# Altium PCB AirBnB-v1.1.PcbDoc (part 8 of 8)
Units mm, origin at the board's own origin, x right, y up, seen from the top; angles counter-clockwise.
Board outline 135.99 x 145 mm, 4 copper layers (Top Layer, Layer 2, Layer 3, Bottom Layer), stack 1.566 mm thick; 343 components, 205 nets, 1123 pads, 557 vias.
Unrouted connection lines stored in the file: 129.
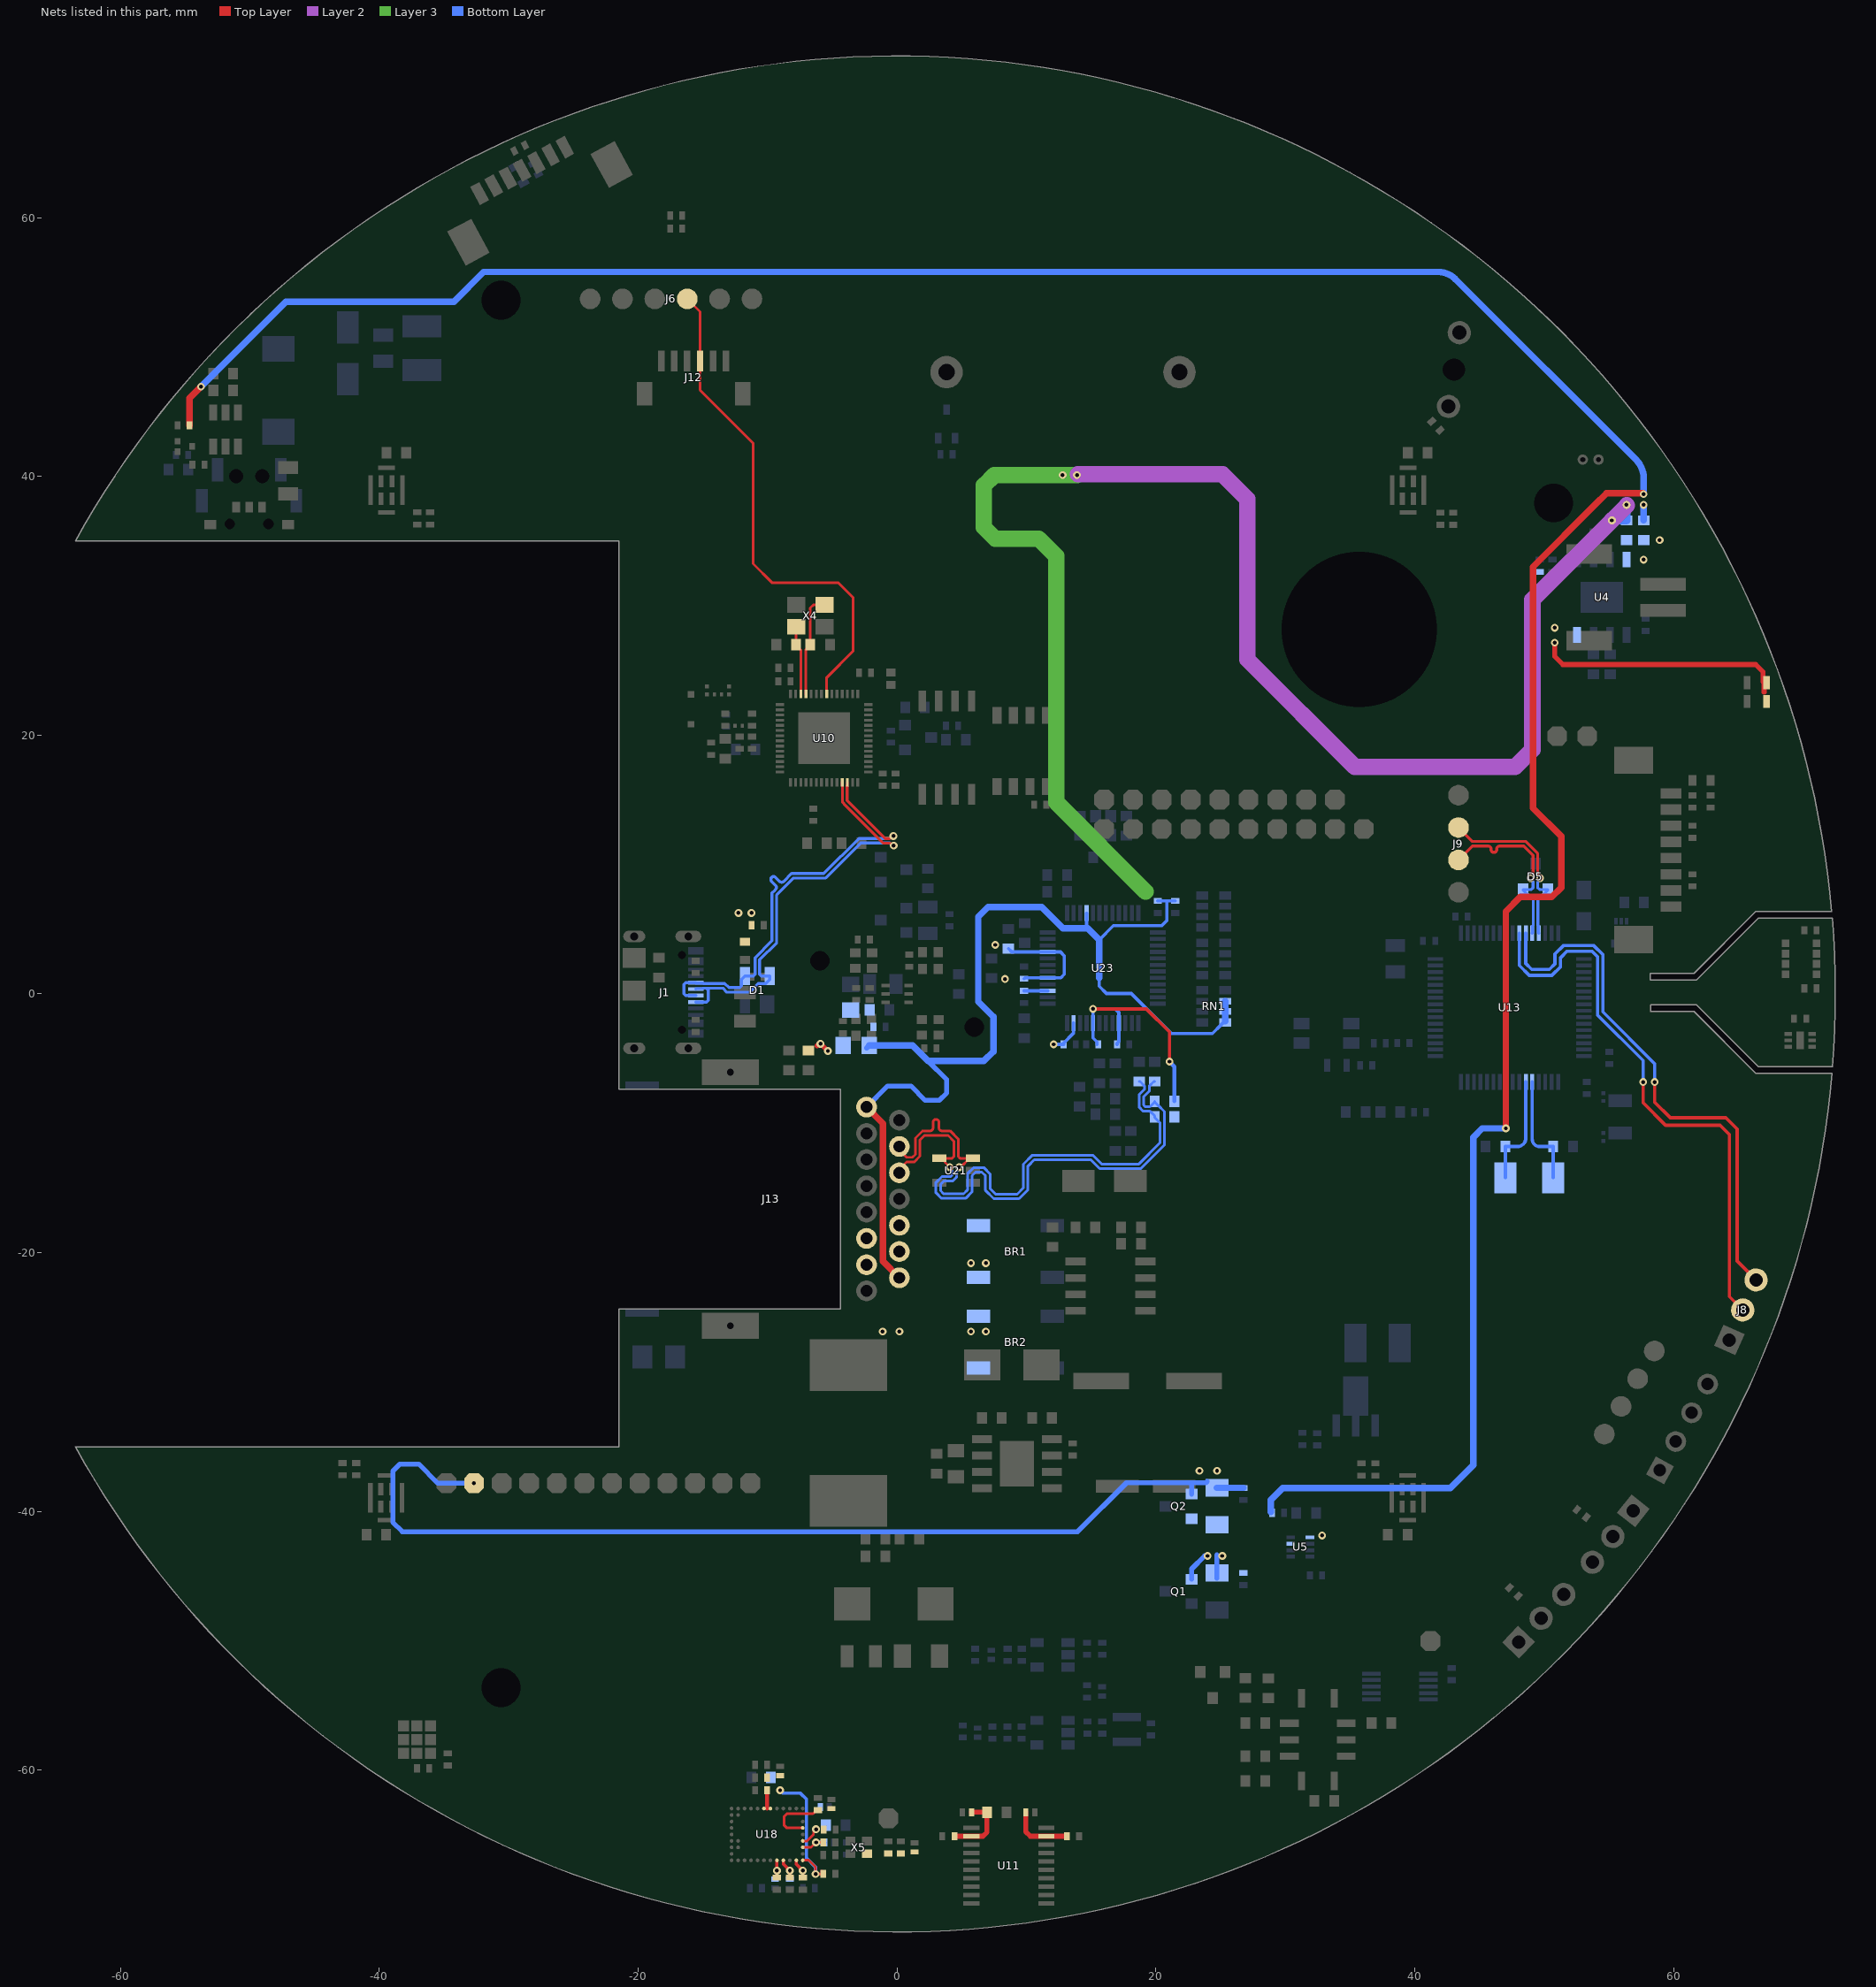
[diagram p6: the nets of this part, all layers, seen from the top]

## Via types
v1: diameter 0.6, hole 0.3, Top Layer to Bottom Layer, 557 vias

## Nets (pads, with @x,y where several pads share a name; then routed paths per layer and width w, separated by ;. In a path a pad name is that pad's centre, name@x,y a point inside that pad or via, vN(x,y) a via of type N, cw(c..) or ccw(c..) an arc to the next point about the centre after c; other vN are vias at no path point) (continued)
TD_N: J13.4 R59.1 R63.1 U21.4 | length 44
  Top Layer w0.203: J13.4@0.181,-13.82 0.181,-13.539 0.738,-12.982 1.335,-12.982 1.768,-12.549 1.768,-11.292 2.12,-10.94 3.95,-10.94 4.383,-11.373 4.383,-12.581 4.264,-12.7 U21.4@3.511,-12.7 ; U21.4@3.261,-12.7 U21.4@3.511,-12.7 ; v1(4.071,-13.39) 3.709,-13.028 3.709,-12.898 U21.4@3.511,-12.7
  Bottom Layer w0.203: v1(4.071,-13.39) 4.071,-13.497 4.257,-13.683 4.257,-13.994 4.138,-14.113 3.463,-14.113 3.005,-14.572 3.005,-15.362 3.44,-15.798 5.293,-15.798 5.795,-15.296 5.795,-14.046 6.071,-13.771 6.552,-13.771 6.83,-14.049 6.83,-15.186 7.474,-15.83 9.425,-15.83 10.114,-15.141 10.114,-13.304 10.603,-12.816 14.977,-12.816 15.555,-13.393 15.659,-13.497 18.838,-13.497 20.664,-11.671 20.664,-9.099 20.201,-8.635 20.182,-8.635 R59.1@19.902,-8.356 ; R59.1@19.902,-8.292 R59.1@19.902,-8.356 ; R63.1@19.902,-6.768 19.839,-6.768 19.483,-7.124 19.483,-7.514 19.054,-7.944 19.054,-8.592 19.173,-8.711 19.547,-8.711 R59.1@19.902,-8.356
TD_P: J13.2 R58.1 R64.1 U21.3 | length 44
  Top Layer w0.203: J13.2@0.181,-11.79 0.181,-12.07 0.738,-12.627 1.188,-12.627 1.413,-12.402 1.413,-11.145 1.959,-10.598 1.973,-10.585 2.551,-10.585 ccw(c2.551,-10.356) 2.78,-10.356 2.78,-9.922 cw(c3.008,-9.922) 3.237,-9.922 3.237,-10.356 ccw(c3.465,-10.356) 3.465,-10.585 4.024,-10.585 4.098,-10.585 4.739,-11.226 4.739,-12.581 4.858,-12.7 U21.3@5.488,-12.7 ; v1@4.997,-13.314 5.488,-12.823 U21.3@5.488,-12.7 ; U21.3@5.861,-12.7 U21.3@5.488,-12.7
  Bottom Layer w0.203: v1(4.798,-13.39) 4.798,-13.497 4.612,-13.683 4.612,-14.142 4.285,-14.469 3.61,-14.469 3.36,-14.719 3.36,-15.215 3.587,-15.442 5.146,-15.442 5.44,-15.149 5.44,-13.899 5.923,-13.416 6.7,-13.416 7.186,-13.902 7.186,-15.038 7.621,-15.474 9.278,-15.474 9.759,-14.993 9.759,-13.157 10.455,-12.46 15.125,-12.46 15.806,-13.142 18.691,-13.142 20.309,-11.524 20.309,-9.948 20.19,-9.829 20.182,-9.829 19.902,-9.55 R58.1@19.902,-9.486 19.902,-9.423 19.547,-9.067 19.025,-9.067 18.698,-8.74 18.698,-7.797 19.128,-7.367 19.128,-7.124 18.772,-6.768 R64.1@18.709,-6.768
TXD: J6.3 J12.3 U10.49 | length 39.7
  Top Layer w0.203: J6.3@-16.215,53.721 -15.223,52.729 J12.3@-15.223,48.913 -15.223,46.668 -11.125,42.57 -11.125,33.244 -9.675,31.795 -4.566,31.795 -3.383,30.612 -3.383,26.511 -5.439,24.455 U10.49@-5.439,23.186
USART1_RX: J8.3 U13.43 | length 42.5
  Top Layer w0.254: v1@58.547,-6.825 58.547,-8.366 59.754,-9.573 64.051,-9.573 64.921,-10.444 64.921,-20.648 J8.3@66.379,-22.105
  Bottom Layer w0.254: U13.43@48.584,4.698 48.584,2.355 49.047,1.893 50.409,1.893 50.836,2.32 50.836,3.088 51.48,3.733 53.85,3.733 54.538,3.045 54.538,-1.39 58.547,-5.399 v1(58.547,-6.806)
USART1_TX: J8.2 U13.42 | length 44.6
  Top Layer w0.254: v1(57.647,-6.806) 57.647,-8.406 59.387,-10.146 63.595,-10.146 64.312,-10.864 64.312,-23.392 J8.2@65.346,-24.426
  Bottom Layer w0.254: U13.42@48.084,4.698 48.084,2.205 48.86,1.43 50.601,1.43 51.27,2.099 51.27,2.801 51.761,3.292 53.713,3.292 54.136,2.868 54.136,-1.634 57.647,-5.145 v1(57.647,-6.806)
USB_D_N: D5.2 J9.3 U13.44 | length 14.4
  Top Layer w0.229: J9.3@43.383,10.358 44.455,11.43 45.127,11.43 45.674,11.43 cw(c45.674,11.201) 45.902,11.201 45.902,11.158 ccw(c46.118,11.158) 46.334,11.158 46.334,11.201 cw(c46.563,11.201) 46.563,11.43 47.667,11.43 48.438,11.43 49.144,10.724 49.144,9.095 v1@48.958,8.91
  Bottom Layer w0.229: v1(48.958,8.96) 48.958,8.859 49.144,8.674 49.144,8.202 49.01,8.068 D5.2@48.378,8.068 48.378,8.018 48.674,7.722 48.724,7.722 49.156,7.29 49.156,5.292 49.12,5.256 49.12,4.734 U13.44@49.084,4.698
USB_D_P: D5.1 J9.2 U13.45 | length 14.4
  Top Layer w0.229: J9.2@43.383,12.858 44.455,11.786 48.585,11.786 49.499,10.871 49.499,9.095 v1@49.685,8.91
  Bottom Layer w0.229: U13.45@49.584,4.698 49.549,4.734 49.549,5.256 49.512,5.292 49.512,7.301 49.933,7.722 49.983,7.722 50.278,8.018 D5.1@50.278,8.068 49.64,8.068 49.499,8.208 49.499,8.674 49.685,8.859 v1(49.685,8.96)
USB_N: D1.4 J1.A7 J1.B7 U10.25 | length 33.8
  Top Layer w0.229: U10.25@-4.239,16.336 -4.239,16.13 -4.217,16.108 -4.217,14.798 -4.008,14.59 -1.283,11.865 -1.075,11.657 -0.557,11.657 -0.361,11.461 v1(-0.261,11.461)
  Bottom Layer w0.229: J1.B7@-15.556,-0.623 -14.733,-0.623 -14.599,-0.489 -14.599,0.291 -14.756,0.449 ; J1.A7@-15.556,0.377 -15.521,0.412 -14.999,0.412 -14.963,0.449 -14.756,0.449 ; v1(-0.261,11.461) -0.36,11.461 -0.566,11.666 -2.803,11.666 -5.512,8.958 -8.004,8.958 -9.306,7.656 -9.306,3.956 -10.62,2.642 -10.62,1.528 -10.486,1.394 D1.4@-9.848,1.394 -9.848,1.094 -10.133,0.809 -10.74,0.809 -11.413,0.136 -13.146,0.136 -13.459,0.449 -14.756,0.449
USB_P: D1.3 J1.A6 J1.B6 U10.26 | length 33.8
  Top Layer w0.229: U10.26@-3.839,16.336 -3.839,16.13 -3.861,16.108 -3.861,14.945 -0.928,12.012 -0.575,12.012 -0.38,12.208 v1(-0.279,12.208)
  Bottom Layer w0.229: J1.A6@-15.556,-0.123 -15.565,-0.115 -16.325,-0.115 -16.459,0.019 -16.459,0.734 -16.325,0.868 -15.565,0.868 J1.B6@-15.556,0.877 ; J1.B6@-15.556,0.841 -14.999,0.841 -14.963,0.805 -13.312,0.805 -12.998,0.491 -12.167,0.491 -12.033,0.625 -12.033,1.109 D1.3@-11.748,1.394 -11.109,1.394 -10.975,1.528 -10.975,2.789 -9.661,4.104 -9.661,7.803 -9.468,7.996 -9.388,8.077 ccw(c-9.549,8.238) -9.388,8.4 -9.695,8.707 cw(c-9.542,8.86) -9.695,9.013 cw(c-9.542,8.86) -9.39,9.013 -9.082,8.705 ccw(c-8.921,8.867) -8.759,8.705 -8.151,9.313 -7.952,9.313 -5.659,9.313 -2.951,12.022 -0.566,12.022 -0.38,12.208 v1(-0.279,12.208)
VAREF: C101.1 U18.L1 | length 1.5
  Top Layer w0.254: U18.L1@-7.785,-66.961 -7.785,-67.262 v1(-7.285,-67.762) C101.1@-7.285,-68.292
VBUS: C11.2 D2.2 D3.2 FB2.2 P1.1 Q1.1 Q2.1 R4.1 R8.1 SB4.1 U5.5 | length 205.5
  Layer 2 w1.27: v1@13.965,40.174 25.143,40.174 27.055,38.262 27.055,25.865 35.378,17.543 47.757,17.543 49.094,18.88 49.094,30.458 v1(55.237,36.601) v1@56.399,37.763
  Layer 3 w1.27: v1(13.897,40.107) v1(12.795,40.107) 7.515,40.107 6.713,39.305 6.713,36.059 7.577,35.195 10.941,35.195 12.298,33.839 12.298,14.806 19.203,7.901
  Bottom Layer w0.381: v1(-32.69,-37.821) -35.479,-37.821 -36.966,-36.334 -38.408,-36.334 -38.964,-36.891 -38.964,-40.836 -38.231,-41.569 13.944,-41.569 17.735,-37.778 22.761,-37.778 23.859,-37.778 D3.2@23.962,-37.674 ; Q1.1@22.761,-45.231 22.761,-44.443 23.77,-43.434 v1(23.996,-43.434) ; Q2.1@22.761,-38.653 22.761,-37.963 ; D2.2@24.723,-45.161 D2.2@24.723,-44.751 24.723,-43.364
  Bottom Layer w0.508: D3.2@24.723,-38.173 R8.1@26.757,-38.173
  Bottom Layer w0.635: v1(55.237,36.601) SB4.1@56.363,36.601 v1(56.363,37.8)
  other v1: 25.13,-43.434 32.842,-41.854 23.368,-36.855 24.723,-36.855 -12.258,6.261 -11.254,6.261
VC1+: BR2.2 J13.9
  other v1: 5.715,-26.099 6.858,-26.099
VC1-: BR1.4 J13.8
VC2+: BR2.4 J13.10
VC2-: BR1.2 J13.11
  other v1: -1.118,-26.099 0.181,-26.099 5.715,-20.803 6.858,-20.803
VCCA: C34.2 FB7.2 R26.2 U11.2 | length 5.4
  Top Layer w0.381: C34.2@4.436,-65.099 6.63,-65.099 6.947,-64.781 R26.2@6.947,-63.246 FB7.2@5.75,-63.246
VCCB: C35.2 FB8.2 U11.19 | length 4.8
  Top Layer w0.381: FB8.2@9.945,-63.246 9.945,-64.749 10.295,-65.099 U11.19@11.534,-65.099 C35.2@13.13,-65.099
VCHRG: LED1.1 LED2.1 R74.2 SB3.2 SB4.2 U4.4 U4.8 | length 19.3
  Top Layer w0.381: v1(50.825,27.158) 50.825,26.079 51.443,25.461 66.352,25.461 66.911,24.902 66.911,24.144 67.001,24.054 67.001,23.33
  other v1: 50.825,28.304 57.694,33.566 58.928,35.077
VDD: C72.2 C73.2 FB9.2 FB10.1 J13.12 J13.14 R68.1 R69.1 RN1.6 RN1.7 RN1.8 U23.28 | length 85.1
  Top Layer w0.508: J13.12@-2.359,-8.745 -1.089,-10.015 -1.089,-20.67 J13.14@0.181,-21.94
  Bottom Layer w0.254: U23.28@14.639,6.245 14.639,5.164 14.74,5.064 ; 14.649,5.286 U23.28@14.649,6.235 ; 15.614,4.175 16.716,5.277 20.45,5.277 20.844,5.671 20.844,7.188 ; 15.621,1.248 15.621,0.6 16.181,0.04 18.101,0.04 21.206,-3.064 24.362,-3.064 25.032,-2.394 25.23,-2.196 RN1.8@25.355,-2.196 ; R68.1@20.142,7.188 20.844,7.188 ; R69.1@21.5,7.188 20.844,7.188
  Bottom Layer w0.381: J13.12@-2.359,-8.415 J13.12@-2.359,-8.745 -0.732,-7.118 1.073,-7.118 2.184,-8.23 3.249,-8.23 3.834,-7.645 3.834,-6.622 2.393,-5.182 ; FB10.1@-2.358,-4.187 FB10.1@-2.159,-3.988
  Bottom Layer w0.508: FB10.1@-2.159,-3.988 1.2,-3.988 2.393,-5.182 6.702,-5.182 7.437,-4.446 7.437,-1.765 6.274,-0.602 6.274,5.959 7.026,6.711 11.182,6.711 12.83,5.064 14.74,5.064 15.621,4.182 15.621,1.248 ; RN1.8@25.355,-2.12 RN1.7@25.355,-1.356 RN1.6@25.355,-0.556
VDD_A: C106.2 FB15.1 U18.J1 | length 1.5
  Top Layer w0.254: U18.J1@-8.785,-66.961 -8.785,-67.262 v1(-8.285,-67.762) C106.2@-8.285,-68.292
VDD_D: C107.2 FB16.1 U18.H1 | length 1.3
  Top Layer w0.254: C107.2@-9.285,-68.292 v1(-9.285,-67.762) U18.H1@-9.285,-66.961
VDD_LF: C104.2 FB14.1 U18.M3 | length 2.4
  Top Layer w0.203: U18.M3@-7.285,-65.961 -6.64,-65.961 v1(-6.26,-65.582) C104.2@-5.711,-65.582
  Bottom Layer w0.305: v1(-6.26,-65.582) FB14.1@-5.591,-65.582
VDD_OSC: C99.1 C100.1 FB11.1 X5.4
VDD_PLL: C103.2 C108.2 FB13.1 U18.M4 | length 1.5
  Top Layer w0.203: U18.M4@-7.285,-65.461 -6.949,-65.461 -6.456,-64.969 -6.456,-64.758 v1(-6.26,-64.562)
VDD_RF: C105.2 C109.2 C110.2 C111.2 FB17.1 U18.F9 U18.G9 U18.M1 | length 12.4
  Top Layer w0.203: U18.M1@-7.285,-66.961 -6.822,-66.961 -6.299,-67.484 v1(-6.299,-68.021) ; v1@-6.289,-68.011 v1@-6.28,-68.021 ; C105.2@-5.838,-67.796 -5.754,-67.88 C105.2@-5.754,-68.011 ; C105.2@-5.72,-68.021 C105.2@-5.711,-68.011
  Top Layer w0.254: v1@-6.28,-68.021 C105.2@-5.72,-68.021
  Top Layer w0.305: -10.035,-62.961 C109.2@-10.035,-61.549
  Bottom Layer w0.254: v1(-9.037,-61.549) -8.809,-61.778 -7.458,-61.778 -6.995,-62.241 -6.995,-66.788 -6.299,-67.484 v1(-6.299,-68.021)
VDD_VCO: C102.2 FB12.1 U18.M6 | length 5
  Top Layer w0.203: U18.M6@-7.285,-64.461 -8.508,-64.461 -8.74,-64.229 -8.74,-63.598 -8.506,-63.364 -6.494,-63.364 C102.2@-6.17,-63.039 ; C102.2@-6.17,-63.037 C102.2@-6.124,-63.083
VDDA: C77.2 C79.2 C81.2 C82.2 C83.2 C84.2 FB10.2 R50.2 R58.2 R59.2 U23.4 U23.8 U23.11 U23.15 U23.17 U23.21 | length 34.6
  Top Layer w0.254: v1(15.139,-1.157) 19.267,-1.157 21.045,-2.935 v1(21.045,-5.231)
  Top Layer w0.381: R50.2@-6.845,-4.369 R50.2@-6.834,-4.38 ; -6.19,-4.013 -6.033,-3.857 -5.903,-3.857 v1(-5.35,-4.41)
  Bottom Layer w0.254: C84.2@8.612,3.498 8.865,3.245 U23.21@11.639,3.245 12.629,3.245 12.927,2.947 12.927,1.518 12.654,1.245 U23.17@11.639,1.245 9.881,1.245 C83.2@9.819,1.182 ; C82.2@9.819,0.242 9.82,0.243 11.638,0.243 U23.15@11.639,0.245 ; v1(12.098,-3.898) C81.2@12.867,-3.898 12.867,-3.809 13.629,-3.046 13.629,-2.265 U23.11@13.639,-2.255 ; C77.2@15.445,-3.898 15.445,-3.708 15.139,-3.402 U23.8@15.139,-2.255 v1(15.139,-1.157) 16.858,-1.157 17.139,-1.438 U23.4@17.139,-2.255 17.139,-3.679 17.009,-3.809 C79.2@17.009,-3.898
  Bottom Layer w0.305: v1(21.045,-5.231) 21.426,-5.612 R59.2@21.426,-8.292
  other v1: -5.919,-3.857 8.34,1.156 7.591,3.792
VIN1: D3.1 Q2.2 R9.2 R11.2 SB3.1 U5.3 | length 232.1
  Top Layer w0.508: R11.2@-54.667,43.942 -54.667,46.05 v1(-53.782,46.936) ; v1(47.041,-10.389) 47.041,6.378 48.155,7.491 50.595,7.491 51.327,8.223 51.327,12.182 49.13,14.379 49.13,32.99 53.94,37.8 54.831,38.691 57.641,38.691 v1(57.694,38.638)
  Bottom Layer w0.508: v1(-53.782,46.936) -47.225,53.492 -34.251,53.492 -31.939,55.804 41.811,55.804 cw(c41.811,53.92) 43.143,55.253 ; R9.2@28.891,-40.027 28.891,-39.103 29.804,-38.189 42.74,-38.189 44.526,-36.403 44.526,-11.076 45.213,-10.389 v1(47.041,-10.389) ; 43.144,55.252 57.095,41.3 cw(c55.651,39.856) 57.694,39.856 v1(57.694,38.638) ; SB3.1@57.694,36.601 v1(57.694,37.8)
XTAL_IN: C41.2 U13.5 X2.1 | length 8.8
  Bottom Layer w0.254: U13.5@49.084,-6.802 49.084,-11.222 ccw(c49.658,-11.222) 49.658,-11.796 C41.2@50.703,-11.796 X2.1@50.703,-14.209
XTAL_N: C55.2 U10.53 X4.3 | length 8
  Top Layer w0.203: U10.53@-7.039,23.186 -7.039,26.604 -6.706,26.937 -6.706,29.827 -6.461,30.072 X4.3@-5.606,30.072
XTAL_OUT: C44.2 U13.6 X2.2 | length 8.7
  Bottom Layer w0.254: X2.2@47.003,-14.209 C44.2@47.003,-11.796 47.934,-11.796 ccw(c47.934,-11.146) 48.584,-11.146 U13.6@48.584,-6.802
XTAL_P: C53.2 U10.54 X4.1 | length 5.3
  Top Layer w0.203: X4.1@-7.806,28.372 -7.806,26.937 -7.439,26.57 U10.54@-7.439,23.186
pads on no net: J1.A8 J1.B8 J1.MH J2.MP1 J2.MP2 J3.1 J3.6 J3.7 J3.8 J3.9 J5.7 J5.8 J5.S1 J5.S2 J9.4 J12.MP1 J12.MP2 LED8.2 RN1.4 RN1.5 RN2.1 RN2.2 RN2.7 RN2.8 SW2.MH SW2.MP SW3.2 SW3.4 SW3.5 SW3.MH SW4.MH U1.4 U2.4 U6.6 U7.2 U7.5 U10.8 U10.28 U10.38 U10.39 U10.40 U10.41 U10.42 U10.52 U12.5 U13.2 U13.8 U13.9 U13.11 U13.14 U13.15 U13.21 U13.22 U13.24 U13.25 U13.26 U13.27 U13.29 U13.33 U13.35 U13.37 U13.38 U13.39 U13.40 U13.41 U13.50 U13.51 U13.52 U13.53 U13.54 U13.55 U13.56 U13.57 U13.58 U13.59 U13.62 U15.2 U19.7 U20.7 U23.7 U23.12 U23.13 U23.18 U23.24 U23.26 U23.46 U23.47 U26.6 U26.9 U27.3 U27.5 X5.1

## Polygon pours and split planes (outlines as drawn)
3V3 on Layer 3 "3V3_L03_P036" (solid, remove dead copper, pour order 36): -31.082,35.712 -31.082,46.533 -14.91,46.533 -14.91,10.287 -20.726,10.287 -20.726,-6.629 -3.356,-6.629 -3.356,-25.121 -20.726,-25.121 -20.726,-35.738 -62.338,-35.738 ccw(c0.213,-0.162) 71.882,-6.629 66.269,-6.629 61.392,-1.753 57.785,-1.753 57.785,2.007 61.239,2.007 66.065,6.833 71.795,6.833 ccw(c0.179,0.171) -62.352,35.712
5V_BOOST on Layer 3 "5V_BOOST_L03_P031" (solid, pour order 31): 15.808,20.543 15.808,18.678 29.032,5.453 29.032,-36.961 30.069,-37.998 34.595,-37.998 36.246,-39.649 36.246,-43.921 35.39,-44.776 31.674,-44.776 31.674,-42.683 33.92,-42.683 33.92,-40.132 26.264,-40.132 26.264,2.184 13.259,15.189 13.259,34.442 11.454,36.247 7.95,36.247 7.95,39.112 15.808,39.112
5V on Layer 3 "5V_L03_P028" (solid, pour order 28): 20.295,52 cw(c7.832,-0.716) 44.644,39.024 55.27,28.397 55.27,16.579 64.389,16.579 64.389,14.644 55.27,14.644 55.27,4.098 45.771,4.098 45.771,-43.663 37.77,-51.664 22.632,-51.664 21.469,-52.827 21.469,-58.998 20.93,-59.538 17.907,-59.538 17.4,-59.031 17.4,-52.859 13.421,-48.879 -26.94,-48.879 -29.235,-46.584 -29.235,-37.44 -27.635,-37.44 -27.635,-43.332 -25.857,-45.11 15.743,-45.11 15.743,-46.975 17.488,-46.975 17.488,-45.11 25.287,-45.11 26.467,-43.93 26.467,-41.848 27.885,-41.848 27.885,-42.672 29.54,-42.672 29.54,-45.11 35.585,-45.11 36.652,-44.044 36.652,-39.472 34.871,-37.69 30.299,-37.69 29.464,-36.855 29.464,-30.05 37.135,-30.05 37.135,13.03 24.714,25.451 24.714,46.736 20.295,46.736
VDDA on Layer 3 "VDDA_L03_P027" (solid, pour order 27): 15.646,-12.871 4.383,-12.871 4.383,-6.426 -6.375,-6.426 -6.375,-2.857 3.237,-2.857 6.385,0.29 6.385,4.089 12.522,4.089 15.646,0.965
POE_PWR_P on Layer 3 "POE_PWR_P_L03_P034" (solid, pour order 34): 17.018,-27.655 21.133,-27.655 21.133,-44.632 17.018,-44.632
POE_PWR_P on Layer 3 "POE_PWR_P_L03_P033" (solid, pour order 33): 16.967,0.914 16.967,-27.076 21.133,-27.076 21.133,-3.251
5V on Layer 3 "5V_L03_P029" (solid, pour order 29): -14.903,19.961 -14.917,10.287 -21.107,10.287 -21.107,-6.426 -6.629,-6.426 -6.629,-2.601 2.936,-2.601 7.003,1.466 14.839,1.466 14.839,1.747 12.548,4.039 -5.512,4.039 -7.366,2.184 -8.534,2.184 -8.534,5.029 -13.157,5.029 -13.157,8.052 -7.849,8.052 -7.849,15.75 6.688,15.75 6.688,29.412 2.54,29.412 2.54,19.961
1V8_SENSOR on Layer 3 "1V8_SENSOR_L03_P025" (solid, pour order 25): 7.747,-52.045 5.512,-52.045 5.512,-60.339 4.56,-61.29 -5.037,-61.29 -5.037,-68.402 -1.778,-68.402 -1.778,-63.652 5.816,-63.652 7.747,-61.722
5V_BOOST on Layer 3 "5V_BOOST_L03_P024" (solid, pour order 24): -36.162,53.061 -36.162,48.438 -31.211,48.438 -31.211,53.061
VBUS on Layer 3 "VBUS_L03_P022" (solid, pour order 22): 33.553,-41.519 33.553,-40.381 32.842,-40.381 32.842,-41.519 30.757,-41.519 30.757,-40.386 25.959,-40.386 25.959,2.031 18.769,9.22 -4.693,9.22 -6.16,7.773 -12.903,7.773 -12.903,5.309 -3.632,5.309 -3.632,6.096 -2.464,6.096 -2.464,5.309 13.365,5.309 21.488,-2.815 21.488,-44.704 25.171,-44.704 26.213,-43.663 26.213,-41.58 28.147,-41.58 28.147,-42.418 33.553,-42.418
VC1+ on Layer 3 "VC1+_L03_P020" (solid, pour order 20): -4.064,-19.91 -4.064,-6.655 3.697,-6.655 3.697,-13.224 10.566,-13.224 10.566,-27.076 3.658,-27.076 7.798,-22.936 7.798,-19.05 2.51,-19.05 1.65,-19.91
VC2- on Layer 3 "VC2-_L03_P019" (solid, pour order 19): 5.613,-19.279 2.73,-19.279 1.27,-20.739 1.27,-23.622 -0.787,-23.622 -0.787,-20.125 -4.064,-20.125 -4.064,-27.076 3.215,-27.076 7.569,-22.722 7.569,-19.279
GND on Bottom Layer "GND_L04_P038" (solid, remove dead copper, pour order 38): -31.082,35.727 -31.082,46.533 -15.367,46.533 -15.367,10.287 -21.107,10.287 -21.107,-6.706 -3.717,-6.706 -3.717,-24.917 -20.879,-24.917 -20.879,-35.738 -62.206,-35.738 ccw(c0.276,-0.18) 71.877,-6.629 66.269,-6.629 61.392,-1.753 57.785,-1.753 57.785,2.007 61.239,2.007 66.065,6.833 71.787,6.833 ccw(c0.243,0.194) -62.206,35.727
VC2- on Bottom Layer "VC2-_L04_P018" (solid, pour order 18): -4.064,-19.91 -4.064,-27.076 0.981,-27.076 0.981,-23.292 -0.838,-23.292 -0.838,-19.91
#VBUS on Bottom Layer "#VBUS_L04_P015" (solid, pour order 15): -14.598,2.227 -13.598,1.227 -12.497,1.227 -12.497,4.002 -13.424,4.002 -14.599,2.827 -16.176,2.827 -16.676,3.327 -19.316,3.327 -19.316,-2.773 -16.356,-2.773 -16.156,-2.573 -11.348,-2.573 -11.348,-0.106 -14.097,-0.106 -14.097,-1.523 -14.547,-1.973 -16.162,-1.973 -16.459,-1.676 -17.424,-1.676 -17.755,-1.346 -17.755,1.651 -17.357,2.049 -16.744,2.049 -16.566,2.227
5V on Bottom Layer "5V_L04_P014" (solid, pour order 14): 29.557,-47.699 28.975,-48.281 22.301,-48.281 22.301,-46.721 27.555,-46.721 28.147,-46.129 28.147,-44.606 27.622,-44.081 26.447,-44.081 26.447,-41.848 28.147,-41.848 28.147,-42.848 30.757,-42.848 30.922,-42.683 30.922,-40.72 31.896,-40.72 31.896,-41.33 31.419,-41.33 31.419,-42.7 31.567,-42.848 32.237,-42.848 32.237,-43.148 31.567,-43.148 31.464,-43.252 31.464,-43.648 30.862,-43.648 30.862,-43.253 30.757,-43.148 29.673,-43.148 29.557,-43.264
GND on Layer 2 "GND_L02_P039" (solid, pour order 39): -31.082,35.727 -31.082,46.533 -15.621,46.533 -15.621,10.287 -21.107,10.287 -21.107,-6.706 -3.717,-6.706 -3.717,-24.917 -20.879,-24.917 -20.879,-35.738 -62.206,-35.738 ccw(c0.276,-0.18) 71.877,-6.629 66.269,-6.629 61.392,-1.753 57.785,-1.753 57.785,2.007 61.239,2.007 66.065,6.833 71.787,6.833 ccw(c0.243,0.194) -62.206,35.727
VC1+ on Layer 2 "VC1+_L02_P017" (solid, pour order 17): -4.064,-17.314 -0.384,-17.314 -0.384,-23.693 7.498,-23.693 7.498,-27.076 -4.064,-27.076
GND on Top Layer "GND_L01_P037" (solid, remove dead copper, pour order 37): -31.082,35.727 -31.082,46.533 -15.621,46.533 -15.621,10.287 -21.107,10.287 -21.107,-6.706 -3.717,-6.706 -3.717,-24.917 -20.879,-24.917 -20.879,-35.738 -62.206,-35.738 ccw(c0.276,-0.18) 71.877,-6.629 66.269,-6.629 61.392,-1.753 57.785,-1.753 57.785,2.007 61.239,2.007 66.065,6.833 71.787,6.833 ccw(c0.243,0.194) -62.206,35.727
NetR54_1 on Top Layer "NETR54_1_L01_P035" (solid, pour order 35): 3.911,-34.786 3.911,-36.152 10.574,-36.152 10.574,-35.091 5.486,-35.091 5.181,-34.786
POE_PWR_P on Top Layer "POE_PWR_P_L01_P021" (solid, pour order 21): 15.619,-37.163 13.284,-39.497 5.181,-39.497 5.181,-36.645 2.286,-36.645 2.286,-41.3 19.406,-41.3 19.406,-31.318 20.226,-31.318 20.226,-28.854 23.8,-28.854 23.8,-26.455 16.675,-26.455 16.675,-28.194 13.618,-28.194 13.618,-32.995 15.619,-32.995

## Other copper
Top Layer:
  rectangle net OS_OT: -4.999,-66.786 -3.213,-66.245
  region net GND: -27.842,63.362 -27.139,63.744 -28.477,66.208 -29.18,65.826
  region net CH2O_5V: -30.189,64.264 -29.141,64.833 -29.561,65.608 -30.609,65.039
  region net CH2O_5V: -28.94,62.765 -28.228,63.152 -29.524,65.539 -30.236,65.152
  rectangle net VBUS: 55.96,36.175 56.745,38.147
  rectangle net VBUS: 54.937,36.175 56.745,37.078
  rectangle net VIN1: 57.235,37.49 58.047,38.977
  rectangle net BATT: 55.704,25.853 57.437,30.158
  rectangle net SPIHD: 2.93,21.247 3.51,23.443
  rectangle net GND: -16.639,20.545 -14.808,21.175
  rectangle net 5V: 53.77,4.329 55.103,6.044
  rectangle net 5V: 26.447,-42.084 31.946,-40.966
  region net BATT: -49.768,35.829 -49.768,39.16 -50.368,39.16 -50.368,35.829
  rectangle net NetC74_1: 11.663,-38.515 12.31,-37.635
  rectangle net NetC74_2: -8.839,-52.033 -3.369,-37.178
  rectangle net NetR54_1: 7.961,-38.061 10.574,-33.627
  rectangle net NetC71_1: -8.839,-34.105 7.33,-31.674
  rectangle net NetC71_1: -8.839,-31.928 7.965,-30.336
  rectangle net POE_PWR_P: 2.286,-37.427 7.343,-36.645
  rectangle net POE_PWR_P: 21.311,-28.854 23.8,-18.745
  rectangle net POE_PWR_P: 15.619,-38.563 19.304,-28.678
  rectangle net POE_PWR_P: 15.215,-38.563 19.304,-37.563
  rectangle net POE_PWR_P: 13.618,-30.551 19.304,-29.291
  rectangle net POE_PWR_P: 18.417,-20.98 23.8,-18.745
  rectangle net NetR46_1: 16.865,-21.475 17.705,-18.796
  region net NetR46_1: 15.418,-23.763 17.705,-21.475 17.11,-20.88 14.822,-23.167
  rectangle net NetR46_1: 12.444,-23.763 15.418,-22.784
  rectangle net NetR45_2: 13.017,-20.98 14.567,-19.177
  rectangle net NetR45_2: 13.017,-20.98 14.402,-17.59
  rectangle net NetR47_2: 10.566,-22.479 12.444,-19.177
  rectangle net NetR47_2: 10.566,-22.479 14.567,-21.387
  rectangle net NetAnt1_ANT#: -16.176,22.983 -13.98,23.339
  rectangle net 5V_BOOST: 11.963,53.949 15.088,56.295
  region net BATT: 46.625,49.901 47.663,50.94 41.072,57.531 40.034,56.493
  rectangle net BATT: 37.871,56.109 41.072,57.531
  rectangle net BATT: 46.146,32.461 47.663,50.94
  rectangle net GND: 57.364,31.158 60.937,32.726
  region net BATT: -43.837,45.576 -33.988,55.425 -34.901,56.338 -44.75,46.489
  rectangle net BATT: -44.75,37.025 -43.409,46.489
  rectangle net 3V3_AUD: 50.978,3.831 53.016,6.366
  rectangle net 3V3: -14.681,20.579 -12.393,21.031
  rectangle net 3V3: -14.681,19.191 -12.833,21.031
  rectangle net 3V3: 30.683,-29.261 34.223,-23.811
  rectangle net 5V: 30.686,-34.215 34.223,-29.57
  rectangle net 5V: 29.464,-42.084 31.946,-40.605
  rectangle net 3V3: -1.431,16.811 0.195,17.268
  rectangle net 3V3: -2.539,17.051 0.195,17.271
  rectangle net VDDA: -7.294,-4.75 -3.861,-3.483
  rectangle net POE_PWR_N: 10.516,-27.184 15.72,-24.19
  rectangle net VDD_OSC: -2.713,-66.75 1.643,-66.111
  rectangle net VDD_PLL: -6.558,-64.902 -5.452,-64.205
  rectangle net VDD_VCO: -6.442,-63.311 -4.779,-62.763
  rectangle net VDD_RF: -10.427,-63.124 -9.642,-62.739
  rectangle net VDD_RF: -10.264,-61.867 -8.737,-60.211
  rectangle net 5V_PoE: 7.747,-52.083 9.95,-41.859
  rectangle net 5V_PoE: 2.608,-52.083 9.95,-50.283
  rectangle net NetC64_1: -8.801,-6.274 -6.394,-5.512
  rectangle net POE_PWR_N: 10.566,-18.415 12.444,-13.197
  rectangle net POE_PWR_P: 18.417,-20.98 21.285,-13.197
  rectangle net POE_PWR_N: 14.935,-18.479 17.704,-15.827
  rectangle net POE_PWR_N: 16.942,-18.479 17.704,-15.827
  rectangle net POE_PWR_N: 13.411,-17.15 17.704,-15.827
  rectangle net POE_PWR_N: 10.566,-17.15 15.277,-13.197
  rectangle net POE_PWR_P: 16.777,-15.476 21.285,-13.197
  rectangle net POE_PWR_N: 10.566,-15.476 15.277,-13.197
  rectangle net 3V3: -8.467,22.861 -8.01,24.634
  rectangle net 3V3: -8.349,22.861 -7.729,23.511
  rectangle net GND: 10.292,13.274 10.889,14.948
  rectangle net 3V3: 11.185,13.274 11.885,16.683
  rectangle net NetC33_2: -9.389,21.451 -8.739,22.071
  rectangle net VCHRG: 66.564,22.106 67.437,24.554
  rectangle net VCHRG: 55.804,32.966 59.433,35.584
  rectangle net VCHRG: 55.804,31.572 56.972,35.56
  rectangle net VCHRG: 50.038,31.572 56.972,32.908
  rectangle net VCHRG: 50.038,26.558 51.384,32.908
  rectangle net GND: 59.665,31.158 60.937,35.56
  rectangle net BATT: 61.224,27.149 63.271,30.158
  rectangle net BATT: 55.704,28.6 63.271,30.158
  rectangle net NetL2_1: -53.746,37.059 -50.768,37.88
  rectangle net 5V_BOOST: -34.9,50.196 -32.537,52.609
  rectangle net GND: -34.9,47.219 -32.537,49.632
  rectangle net NetL2_1: -50.3,41.677 -45.263,44.136
  rectangle net SW_5V: -49.164,44.326 -45.263,50.86
  rectangle net SW_5V: -51.252,44.326 -49.086,45.546
  rectangle net NetL2_1: -52.202,43.073 -45.263,44.136
  rectangle net NetL2_1: -53.746,37.059 -52.53,41.402
  rectangle net NetL2_1: -52.258,40.585 -51.529,44.136
  rectangle net NetL2_1: -53.746,40.585 -51.529,41.402
  rectangle net NetQ3_3: -54.682,41.706 -52.532,42.951
  rectangle net NetQ3_3: -54.682,40.587 -54.163,42.951
  rectangle net NetQ3_3: -53.152,41.706 -52.532,42.926
  region net BATT: -43.534,37.025 -43.534,39.16 -48.311,39.16 -48.311,37.025
  region net BATT: -46.299,38.144 -46.299,39.16 -51.368,39.16 -51.368,38.144
  rectangle net #VBUS: -19.016,-0.686 -12.889,0.127
  rectangle net #VBUS: -19.016,-1.672 -17.836,0.127
  rectangle net VBUS: -13.868,4.027 -10.795,6.706
  region net VBUS: -10.795,6.706 -12.59,6.706 -12.59,3.727 -10.795,3.727
  rectangle net NetC8_2: -12.605,-0.396 -10.795,2.927
  rectangle net #VBUS: -13.894,-2.692 -10.795,-1.402
  rectangle net #VBUS: -14.249,-2.692 -12.889,3.691
  rectangle net 5V: 26.447,-44.209 29.473,-40.966
  rectangle net 3V3: 70.75,2.818 71.35,5.245
  rectangle net 3V3: 68.35,-3.238 69.166,-1.594
  rectangle net 3V3: 68.35,-2.229 69.543,-1.594
  rectangle net NetC71_1: -8.839,-30.678 7.965,-26.678
  rectangle net NetC74_2: -8.839,-48.414 -2.054,-37.178
  rectangle net NetC74_2: -6.759,-41.178 -0.759,-37.178
  region net NetC74_1: -1.292,-41.643 -1.292,-43.927 0.572,-43.927 0.572,-41.643
  region net NetD8_2: -2.169,-50.283 -2.169,-52.083 1.088,-52.083 1.088,-50.283
  region net NetC74_2: -8.839,-37.178 -8.839,-41.178 -0.759,-41.178 -0.759,-37.178
  region net NetC71_1: 5.793,-26.678 5.793,-34.705 7.343,-34.705 7.343,-26.678
  rectangle net PMS_5V: 59.008,15.103 61.784,15.903
  rectangle net GND: 59.008,13.853 63.184,14.653
  rectangle net PMS_5V: 61.166,15.103 61.784,16.91
  rectangle net 5V: 62.549,15.113 63.184,16.91
  rectangle net GND: 59.008,13.853 60.608,14.653
Layer 2:
  rectangle net VBUS: 12.295,39.573 14.572,40.778
Layer 3:
  rectangle net NetR54_1: 7.562,-37.648 10.912,-34.559
  rectangle net VDD: -0.507,-23.252 0.96,-21.076
  rectangle net POE_PWR_N: 10.829,-27.076 15.672,-13.224
  rectangle net 5V_BOOST: 31.674,-44.776 33.553,-42.683
  pour cut-out: 15.765,-27.173 15.741,-27.148 10.837,-27.148 10.837,-27.428 10.909,-27.5 15.765,-27.5 15.765,-27.185
  pour cut-out: 29.464,-30.05 29.463,-30.048 29.032,-30.048 29.032,-29.892 29.464,-29.892 29.464,-30.048
Bottom Layer:
  region net BATT: -36.381,55.261 -35.345,54.158 -32.547,56.785 -33.583,57.888
  region net 5V: -26.507,64.362 -27.19,63.991 -26.429,62.588 -25.746,62.959
  region net CH2O_5V: -30.609,65.045 -29.736,63.437 -29.033,63.818 -29.906,65.427
  region net 5V: -26.507,64.362 -29.389,62.797 -29.034,62.143 -26.152,63.708
  rectangle net 3V3: 34.466,-34.215 36.4,-32.218
  rectangle net NetQ5_3: 2.165,19.101 4.166,20.23
  rectangle net NetQ5_3: 3.456,19.129 4.038,21.04
  rectangle net NetC62_2: -20.989,-26.65 -18.389,-24.35
  rectangle net NetC62_2: -20.989,-7.35 -18.389,-5.05
  rectangle net 5V: 53.772,4.097 55.698,5.217
  rectangle net 5V: 30.087,-43.148 32.237,-42.848
  rectangle net VDDA: 8.045,0.014 10.136,1.503
  rectangle net 3V3: 4.338,1.143 5.793,1.905
  rectangle net BATT: -52.513,37.006 -47.465,39.16
  region net BATT: -49.57,35.829 -49.57,39.16 -50.549,39.16 -50.549,35.829
  rectangle net VBUS: -14.402,4.902 -10.719,7.264
  rectangle net NetR54_1: 7.562,-37.44 10.912,-33.37
  rectangle net BATT: 46.076,21.589 47.854,34.823
  rectangle net BATT: 46.076,21.311 63.271,23.038
  rectangle net BATT: 61.265,21.589 63.271,28.349
  rectangle net BATT: -33.583,56.413 40.615,57.888
  rectangle net 3V3: 6.121,30.748 19.126,34.595
  rectangle net 5V: 2.53,24.917 28.448,28.85
  rectangle net 3V3: 30.683,-29.261 36.4,-23.811
  rectangle net 3V3: 34.466,-32.6 36.4,-23.811
  rectangle net 5V: 30.686,-34.215 34.223,-29.57
  rectangle net 3V3: 5.103,1.143 5.793,5.454
  rectangle net 3V3: 0.27,4.335 3.133,5.454
  rectangle net 3V3: 0.27,4.811 5.793,5.454
  rectangle net NetC69_1: 1.927,5.937 4.373,8.538
  rectangle net NetC69_1: 0.27,5.937 4.373,7.219
  rectangle net NetQ7_3: 0.27,9.201 2.816,10.062
  rectangle net 3V3: -0.785,18.46 1.085,19.646
  rectangle net 3V3_AUD: 50.934,4.098 53.64,6.332
  rectangle net 3V3_AUD: 50.934,5.357 55.698,6.332
  rectangle net NetC39_2: 57.333,5.357 58.095,7.534
  rectangle net NetC39_2: 56.218,5.357 58.095,6.332
  rectangle net 5V: 54.476,3.572 55.698,5.217
  rectangle net 5V: 54.476,3.572 55.698,4.581
  rectangle net 5V: 55.329,4.32 56.503,4.582
  rectangle net 5V: 56.218,4.32 56.503,5.217
  rectangle net NetC70_2: -4.254,4.285 -0.81,4.893
  rectangle net NetC70_2: -4.254,0 -3.159,4.893
  rectangle net NetC70_2: -1.73,4.427 -0.81,6.105
  rectangle net VDDA: -6.312,-5.055 -3.559,-2.946
  rectangle net VDDA: 7.259,3.383 9.056,4.119
  rectangle net VDDA: 21.045,-9.931 21.807,-7.848
  rectangle net NetC70_2: -4.254,0 -1.613,1.524
  rectangle net VDD: -4.254,-1.854 -1.624,-0.654
  rectangle net VDD: -2.899,-4.648 -1.559,-0.654
  region net PWR_STAT: 34.036,-40.742 34.036,-41.427 46.126,-41.427 46.126,-40.742
  rectangle net POE_PWR_P: 20.221,-19.19 22.56,-13.213
  rectangle net VDD_PLL: -6.574,-64.859 -5.736,-62.554
  rectangle net VDD_PLL: -6.573,-64.859 -5.118,-63.817
  rectangle net VDD_RF: -10.124,-62.044 -8.544,-60.122
  rectangle net 1V8_SENSOR: -4.089,-70.102 -3.425,-67.551
  rectangle net 1V8_SENSOR: -7.514,-70.102 -3.425,-69.621
  rectangle net 1V8_SENSOR: -7.514,-70.102 -7.056,-68.794
  rectangle net GND: 13.98,-53.669 15.001,-50.731
  rectangle net GND: 13.98,-52.77 16.167,-50.729
  rectangle net GND: 12.714,-51.429 16.167,-50.729
  rectangle net NetC6_2: 12.714,-50.479 17.12,-49.779
  rectangle net NetC6_2: 16.401,-53.761 17.202,-49.779
  region net 3V3_CLEAN: 7.048,-54.061 7.048,-54.865 16.162,-54.865 16.162,-54.061
  rectangle net 3V3_CLEAN: 7.048,-56.942 7.899,-54.061
  region net NetC6_2: 15.549,-52.991 15.549,-53.761 17.202,-53.761 17.202,-52.991
  rectangle net 3V3_SENSOR: -5.091,-65.882 -3.545,-65.282
  rectangle net 5V: 18.334,-59.286 20.027,-57.087
  rectangle net VBUS: 22.301,-39.063 25.623,-36.506
  rectangle net VBUS: 22.301,-45.641 25.623,-42.864
  rectangle net 5V_PoE: 7.747,-44.43 21.221,-42.062
  rectangle net PWR_STAT: 34.036,-44.36 34.722,-40.03
  rectangle net PWR_STAT: 45.872,-41.427 46.558,-32.443
  rectangle net PWR_STAT: 31.567,-44.36 34.722,-43.739
  rectangle net VBUS: 31.567,-42.148 33.378,-41.487
  rectangle net VC2+: 1.195,-21.031 4.699,-18.999
  rectangle net VC1+: 5.055,-29.424 7.199,-25.753
  rectangle net VC1-: 1.195,-18.674 7.199,-16.441
  rectangle net GND: 37.733,3.229 40.873,4.416
  rectangle net GND: 54.416,-12.24 54.716,-11.21
  rectangle net GND: 51.846,-12.24 54.716,-11.351
  rectangle net GND: 52.103,-7.974 52.807,-7.255
  rectangle net GND: 52.103,-7.974 54.716,-7.517
  rectangle net BATT: 56.063,25.934 63.271,28.349
  rectangle net GND: 2.923,41.388 3.581,43.361
  region net Siren: 4.723,43.361 4.064,43.361 4.064,41.388 4.723,41.388
  rectangle net VCHRG: 49.149,26.666 49.974,32.855
  rectangle net VCHRG: 49.149,26.666 52.853,28.793
  rectangle net VCHRG: 55.918,32.966 59.433,35.584
  rectangle net BATT: 56.063,27.149 63.271,28.349
  rectangle net 5V_PoE: 19.482,-46.591 21.221,-39.193
  rectangle net GND: -40.462,47.06 -32.614,49.56
  rectangle net SW_5V: -45.845,46.268 -41.593,48.768
  rectangle net SW_5V: -49.053,46.268 -44.323,50.86
  rectangle net NetL2_1: -49.053,41.677 -45.263,44.46
  rectangle net SW_5V: -49.053,47.627 -44.323,50.86
  rectangle net 3V3_SENSOR: 4.762,-57.803 6.523,-57.241
  rectangle net 3V3_CLEAN: 5.923,-56.941 11.308,-55.791
  rectangle net NetC62_2: -20.989,-7.05 -10.689,-5.05
  rectangle net NetC62_2: -20.989,-28.956 -18.927,-24.65
  rectangle net NetC62_2: -20.989,-26.65 -10.689,-24.65
  rectangle net NetC62_2: -15.089,-26.65 -10.689,-24.65
  rectangle net 5V_BOOST: 32.404,-43.505 33.378,-42.318
  rectangle net 5V_BOOST: 31.567,-42.711 33.378,-42.318
  rectangle net VIN1: 28.382,-42.701 29.927,-40.742
  rectangle net PWR_STAT: 31.567,-46.355 32.237,-43.348
  rectangle net VBUS: 24.723,-45.005 27.082,-44.43
  rectangle net VBUS: 22.301,-39.063 25.623,-37.503
  rectangle net VIN1: 28.382,-42.703 30.757,-42.304
  rectangle net VIN1: 28.382,-42.703 29.203,-39.793
  rectangle net VIN1: 22.301,-41.703 29.203,-40.143
  rectangle net NetR9_1: 29.686,-40.555 31.23,-39.666
  rectangle net NetR9_1: 30.087,-42.148 30.757,-39.666
  region net POE_PWR_N: 15.837,-21.407 13.43,-21.407 13.43,-29.411 15.837,-29.411
  rectangle net POE_PWR_N: 11.099,-22.92 15.837,-21.425
  region net POE_PWR_N: 15.837,-28.013 11.099,-28.013 11.099,-29.411 15.837,-29.411
  rectangle net POE_PWR_P: 7.947,-25.898 12.899,-24.013
  rectangle net POE_PWR_P: 7.947,-19.19 22.56,-16.548
  rectangle net POE_PWR_P: 7.947,-25.898 10.369,-17.367
  rectangle net VC2-: 5.055,-22.92 7.199,-19.101
  rectangle net VC2+: 1.65,-25.411 7.199,-23.685
  region net VC2+: 4.699,-25.411 4.699,-18.999 1.65,-18.999 1.65,-25.411
  rectangle net VC2+: -0.619,-20.838 4.699,-18.999
  rectangle net VC1-: -0.619,-18.711 7.199,-16.909
  rectangle net 5V_BOOST: -43.293,50.268 -32.614,52.768
  region net GND: 16.167,-57.441 16.167,-56.736 12.708,-56.736 12.708,-57.441
  region net GND: 9.95,-52.956 9.95,-51.32 8.223,-51.32 8.223,-52.956
  region net 1V8_SENSOR: 7.585,-52.956 7.585,-51.229 5.721,-51.229 5.721,-52.956
  region net 1V8: 11.314,-50.929 11.314,-49.779 6.827,-49.779 6.827,-50.929
  region net 5V: 19.926,-58.12 19.926,-57.087 16.655,-57.087 16.655,-58.12
  region net NetC4_2: 18.855,-56.491 18.855,-55.57 12.708,-55.57 12.708,-56.491
  rectangle net VDD_A: -8.585,-68.611 -7.897,-67.439
  rectangle net VDD_D: -9.737,-68.611 -8.943,-67.438
  rectangle net 1V8_SENSOR: -10.666,-69.429 -7.056,-68.794
  rectangle net 3V3: 40.324,-52.323 43.169,-51.865
  rectangle net 3V3: 40.329,-52.684 41.779,-51.865

## Silkscreen, mask and mechanical layers (free items; w line width, h text height)
Top Overlay:
  drawing of 439 lines, arcs and shapes, not listed
  text "*" at -7.749,32.49 h2
  text "-" at 62.534,31.02 h1.52 r90
  text "+" at 62.534,28.937 h1.52 r90
  text "BATT" at 50,27.158 h1 r90
  text "PWR" at 59.445,23.561 h1.02
  text "CHARGING" at 59.445,22.125 h1.02
  text "PMS_RX" at 45.176,19.421 h1
  text "PMS_TX" at 54.193,19.421 h1
  text "*" at -11.37,16.255 h2
  text "CH2O_TX" at 16.479,15.868 h1 r90
  text "CH2O_RX" at 18.709,15.868 h1 r90
  text "SDA" at 20.938,15.868 h1 r90
  text "SCL" at 23.168,15.868 h1 r90
  text "W5500 MISO" at 25.398,15.868 h0.9 r90
  text "VBUS" at 27.627,15.868 h1 r90
  text "W5500 CS" at 29.857,15.868 h1 r90
  text "W5500 SCLK" at 32.086,15.868 h0.9 r90
  text "NO2" at 34.316,15.868 h1 r90
  text "BGT CS" at 16.502,6.419 h1 r90
  text "BGT CLK" at 18.732,6.419 h1 r90
  text "BGT MISO" at 20.961,6.419 h1 r90
  text "MGT MOSI" at 23.191,6.419 h1 r90
  text "SPI3 MOSI IO7" at 25.42,6.419 h0.8 r90
  text "SPI3 CS RDR IO10" at 28.05,6.419 h1 r90
  text "SPI3 MISO IO6" at 30.279,6.419 h1 r90
  text "SPI3 SCK IO8" at 32.509,6.419 h1 r90
  text "CO" at 34.338,6.419 h1 r90
  text "NH3" at 36.568,6.419 h1 r90
  text "+" at -0.3,-0.45 h0.9
  text "GND" at -34.323,-44.152 h1 r90
  text "VBUS" at -32.19,-44.152 h1 r90
  text "5V_PoE" at -30.056,-44.152 h1 r90
  text "5V" at -27.923,-44.152 h1 r90
  text "3v3" at -25.789,-44.152 h1 r90
  text "1v8" at -23.655,-44.152 h1 r90
  text "3v3_Sensor" at -21.522,-44.152 h1 r90
  text "1v8_Sensor" at -19.418,-44.152 h1 r90
  text "BATT" at -17.284,-44.152 h1 r90
  text "PWR_STAT" at -15.15,-44.152 h1 r90
  text "5V_BOOST" at -13.017,-44.152 h1 r90
  text "ETH_POK" at -10.854,-44.152 h1 r90
  text "ADS Ready" at 35.22,-50.513 h1
Bottom Overlay:
  drawing of 111 lines, arcs and shapes, not listed
  text "Rev-v1.1" at -29.839,-46.508 h3
Board Outline:
  the board outline again, w0.127
Fabrication:
  drawing of 295 lines, arcs and shapes, not listed
  text "Layer" at 155.653,85.979 h1.52
  text "Name" at 166.065,85.979 h1.52
  text "Material" at 189.681,85.979 h1.52
  text "Thickness" at 211.519,85.979 h1.52
  text "Constant" at 228.025,85.979 h1.52
  text "Board Layer Stack" at 242.499,85.979 h1.52
  text "Top Overlay" at 166.065,82.931 h1.52
  text "Top Solder" at 166.065,79.883 h1.52
  text "Solder Resist" at 189.681,79.883 h1.52
  text "0.79mil" at 211.519,79.883 h1.52
  text "3.3" at 228.025,79.883 h1.52
  text "1" at 155.653,76.835 h1.52
  text "Top Layer" at 166.065,76.835 h1.52
  text "1.38mil" at 211.519,76.835 h1.52
  text "Dielectric 2" at 166.065,73.787 h1.52
  text "PP-022" at 189.681,73.787 h1.52
  text "7.99mil" at 211.519,73.787 h1.52
  text "4.4" at 228.025,73.787 h1.52
  text "2" at 155.653,70.739 h1.52
  text "Layer 2" at 166.065,70.739 h1.52
  text "CF-004" at 189.681,70.739 h1.52
  text "1.18mil" at 211.519,70.739 h1.52
  text "Dielectric 1" at 166.065,67.691 h1.52
  text "FR-4" at 189.681,67.691 h1.52
  text "40.55mil" at 211.519,67.691 h1.52
  text "4.6" at 228.025,67.691 h1.52
  text "3" at 155.653,64.643 h1.52
  text "Layer 3" at 166.065,64.643 h1.52
  text "CF-004" at 189.681,64.643 h1.52
  text "1.18mil" at 211.519,64.643 h1.52
  text "Dielectric 3" at 166.065,61.595 h1.52
  text "PP-022" at 189.681,61.595 h1.52
  text "7.99mil" at 211.519,61.595 h1.52
  text "4.4" at 228.025,61.595 h1.52
  text "4" at 155.653,58.547 h1.52
  text "Bottom Layer" at 166.065,58.547 h1.52
  text "1.38mil" at 211.519,58.547 h1.52
  text "Bottom Solder" at 166.065,55.499 h1.52
  text "Solder Resist" at 189.681,55.499 h1.52
  text "0.79mil" at 211.519,55.499 h1.52
  text "3.3" at 228.025,55.499 h1.52
  text "Bottom Overlay" at 166.065,52.451 h1.52
  text "Total board thickness:" at 155.653,49.403 h1.52
  text "63.23mil" at 211.519,49.403 h1.52
Mechanical 13:
  lines w0.127: -21.505,27.385 ccw(c-21.492,27.385) -21.492,27.372
Drill Drawing:
  drawing of 187 lines, arcs and shapes, not listed
  text "Symbol" at -70.578,165.024 h1.83
  text "Count" at -57.729,165.024 h1.83
  text "Hole Size" at -42.747,165.024 h1.83
  text "Plated" at -12.022,165.024 h1.83
  text "Hole Type" at 0.827,165.024 h1.83
  text "Drill Layer Pair" at 19.466,165.024 h1.83
  text "Via/Pad" at 57.554,165.024 h1.83
  text "Pad Shape" at 72.537,165.024 h1.83
  text "Template" at 91.48,165.024 h1.83
  text "Description" at 120.427,165.024 h1.83
  text "Hole Tolerance (+)" at 142.113,165.024 h1.83
  text "Hole Tolerance (-)" at 175.987,165.024 h1.83
  text "Hole Length" at 209.86,165.024 h1.83
  text "Routed Path Length" at 237.538,165.024 h1.83
  text "1" at -57.729,161.214 h1.52
  text "1.720mm (67.72mil)" at -42.747,161.214 h1.52
  text "NPTH" at -12.022,161.214 h1.52
  text "Round" at 0.827,161.214 h1.52
  text "Top Layer - Bottom Layer" at 19.466,161.214 h1.52
  text "Pad" at 57.554,161.214 h1.52
  text "Rounded" at 72.537,161.214 h1.52
  text "c0hn172" at 91.48,161.214 h1.52
  text "-" at 209.86,161.214 h1.52
  text "-" at 237.538,161.214 h1.52
  text "1" at -57.729,157.404 h1.52
  text "12.000mm (472.44mil)" at -42.747,157.404 h1.52
  text "NPTH" at -12.022,157.404 h1.52
  text "Round" at 0.827,157.404 h1.52
  text "Top Layer - Bottom Layer" at 19.466,157.404 h1.52
  text "Pad" at 57.554,157.404 h1.52
  text "Rounded" at 72.537,157.404 h1.52
  text "c0hn1200" at 91.48,157.404 h1.52
  text "-" at 209.86,157.404 h1.52
  text "-" at 237.538,157.404 h1.52
  text "2" at -57.729,153.594 h1.52
  text "0.400mm (15.75mil)" at -42.747,153.594 h1.52
  text "PTH" at -12.022,153.594 h1.52
  text "Round" at 0.827,153.594 h1.52
  text "Top Layer - Bottom Layer" at 19.466,153.594 h1.52
  text "Pad" at 57.554,153.594 h1.52
  text "Rounded" at 72.537,153.594 h1.52
  text "c80h40" at 91.48,153.594 h1.52
  text "-" at 209.86,153.594 h1.52
  text "-" at 237.538,153.594 h1.52
  text "C" at -71.317,153.34 h1.69
  text "2" at -57.729,149.784 h1.52
  text "0.520mm (20.47mil)" at -42.747,149.784 h1.52
  text "PTH" at -12.022,149.784 h1.52
  text "Rectangle" at 0.827,149.784 h1.52
  text "Top Layer - Bottom Layer" at 19.466,149.784 h1.52
  text "Pad" at 57.554,149.784 h1.52
  text "Rectangle" at 72.537,149.784 h1.52
  text "(Mixed)" at 91.48,149.784 h1.52
  text "1.820mm (71.65mil)" at 209.86,149.784 h1.52
  text "1.820mm (71.65mil)" at 237.538,149.784 h1.52
  text "2" at -57.729,145.974 h1.52
  text "0.600mm (23.62mil)" at -42.747,145.974 h1.52
  text "PTH" at -12.022,145.974 h1.52
  text "Slot" at 0.827,145.974 h1.52
  text "Top Layer - Bottom Layer" at 19.466,145.974 h1.52
  text "Pad" at 57.554,145.974 h1.52
  text "Rounded" at 72.537,145.974 h1.52
  text "r90_170h60_140r100" at 91.48,145.974 h1.52
  text "1.400mm (55.12mil)" at 209.86,145.974 h1.52
  text "0.800mm (31.50mil)" at 237.538,145.974 h1.52
  text "2" at -57.729,142.164 h1.52
  text "0.600mm (23.62mil)" at -42.747,142.164 h1.52
  text "PTH" at -12.022,142.164 h1.52
  text "Slot" at 0.827,142.164 h1.52
  text "Top Layer - Bottom Layer" at 19.466,142.164 h1.52
  text "Pad" at 57.554,142.164 h1.52
  text "Rounded" at 72.537,142.164 h1.52
  text "(Mixed)" at 91.48,142.164 h1.52
  text "1.700mm (66.93mil)" at 209.86,142.164 h1.52
  text "1.100mm (43.31mil)" at 237.538,142.164 h1.52
  text "2" at -57.729,138.354 h1.52
  text "0.620mm (24.41mil)" at -42.747,138.354 h1.52
  text "NPTH" at -12.022,138.354 h1.52
  text "Round" at 0.827,138.354 h1.52
  text "Top Layer - Bottom Layer" at 19.466,138.354 h1.52
  text "Pad" at 57.554,138.354 h1.52
  text "Rounded" at 72.537,138.354 h1.52
  text "c0hn62" at 91.48,138.354 h1.52
  text "-" at 209.86,138.354 h1.52
  text "-" at 237.538,138.354 h1.52
  text "2" at -57.729,134.544 h1.52
  text "0.810mm (31.89mil)" at -42.747,134.544 h1.52
  text "NPTH" at -12.022,134.544 h1.52
  text "Round" at 0.827,134.544 h1.52
  text "Top Layer - Bottom Layer" at 19.466,134.544 h1.52
  text "Pad" at 57.554,134.544 h1.52
  text "Rounded" at 72.537,134.544 h1.52
  text "c0hn81" at 91.48,134.544 h1.52
  text "-" at 209.86,134.544 h1.52
  text "-" at 237.538,134.544 h1.52
  text "2" at -57.729,130.734 h1.52
  text "1.100mm (43.31mil)" at -42.747,130.734 h1.52
  text "NPTH" at -12.022,130.734 h1.52
  text "Round" at 0.827,130.734 h1.52
  text "Top Layer - Bottom Layer" at 19.466,130.734 h1.52
  text "Pad" at 57.554,130.734 h1.52
  text "Rounded" at 72.537,130.734 h1.52
  text "c0hn110" at 91.48,130.734 h1.52
  text "-" at 209.86,130.734 h1.52
  text "-" at 237.538,130.734 h1.52
  text "2" at -57.729,126.924 h1.52
  text "1.100mm (43.31mil)" at -42.747,126.924 h1.52
  text "PTH" at -12.022,126.924 h1.52
  text "Round" at 0.827,126.924 h1.52
  text "Top Layer - Bottom Layer" at 19.466,126.924 h1.52
  text "Pad" at 57.554,126.924 h1.52
  text "Rounded" at 72.537,126.924 h1.52
  text "c180h110" at 91.48,126.924 h1.52
  text "-" at 209.86,126.924 h1.52
  text "-" at 237.538,126.924 h1.52
  text "2" at -57.729,123.114 h1.52
  text "1.250mm (49.21mil)" at -42.747,123.114 h1.52
  text "PTH" at -12.022,123.114 h1.52
  text "Round" at 0.827,123.114 h1.52
  text "Top Layer - Bottom Layer" at 19.466,123.114 h1.52
  text "Pad" at 57.554,123.114 h1.52
  text "Rounded" at 72.537,123.114 h1.52
  text "c250h125" at 91.48,123.114 h1.52
  text "-" at 209.86,123.114 h1.52
  text "-" at 237.538,123.114 h1.52
  text "2" at -57.729,119.304 h1.52
  text "1.500mm (59.06mil)" at -42.747,119.304 h1.52
  text "NPTH" at -12.022,119.304 h1.52
  text "Round" at 0.827,119.304 h1.52
  text "Top Layer - Bottom Layer" at 19.466,119.304 h1.52
  text "Pad" at 57.554,119.304 h1.52
  text "Rounded" at 72.537,119.304 h1.52
  text "c0hn150" at 91.48,119.304 h1.52
  text "-" at 209.86,119.304 h1.52
  text "-" at 237.538,119.304 h1.52
  text "B" at -71.317,119.05 h1.69
  text "3" at -57.729,115.494 h1.52
  text "3.000mm (118.11mil)" at -42.747,115.494 h1.52
  text "NPTH" at -12.022,115.494 h1.52
  text "Round" at 0.827,115.494 h1.52
  text "Top Layer - Bottom Layer" at 19.466,115.494 h1.52
  text "Pad" at 57.554,115.494 h1.52
  text "Rounded" at 72.537,115.494 h1.52
  text "c0hn300" at 91.48,115.494 h1.52
  text "-" at 209.86,115.494 h1.52
  text "-" at 237.538,115.494 h1.52
  text "4" at -57.729,111.684 h1.52
  text "0.950mm (37.40mil)" at -42.747,111.684 h1.52
  text "PTH" at -12.022,111.684 h1.52
  text "Round" at 0.827,111.684 h1.52
  text "Top Layer - Bottom Layer" at 19.466,111.684 h1.52
  text "Pad" at 57.554,111.684 h1.52
  text "(Mixed)" at 72.537,111.684 h1.52
  text "(Mixed)" at 91.48,111.684 h1.52
  text "-" at 209.86,111.684 h1.52
  text "-" at 237.538,111.684 h1.52
  text "9" at -57.729,107.874 h1.52
  text "1.020mm (40.16mil)" at -42.747,107.874 h1.52
  text "PTH" at -12.022,107.874 h1.52
  text "Round" at 0.827,107.874 h1.52
  text "Top Layer - Bottom Layer" at 19.466,107.874 h1.52
  text "Pad" at 57.554,107.874 h1.52
  text "(Mixed)" at 72.537,107.874 h1.52
  text "(Mixed)" at 91.48,107.874 h1.52
  text "-" at 209.86,107.874 h1.52
  text "-" at 237.538,107.874 h1.52
  text "A" at -71.317,107.62 h1.69
  text "15" at -57.729,104.064 h1.52
  text "0.920mm (36.22mil)" at -42.747,104.064 h1.52
  text "PTH" at -12.022,104.064 h1.52
  text "Round" at 0.827,104.064 h1.52
  text "Top Layer - Bottom Layer" at 19.466,104.064 h1.52
  text "Pad" at 57.554,104.064 h1.52
  text "Rounded" at 72.537,104.064 h1.52
  text "c160h92" at 91.48,104.064 h1.52
  text "-" at 209.86,104.064 h1.52
  text "-" at 237.538,104.064 h1.52
  text "557" at -57.729,100.254 h1.52
  text "0.300mm (11.81mil)" at -42.747,100.254 h1.52
  text "PTH" at -12.022,100.254 h1.52
  text "Round" at 0.827,100.254 h1.52
  text "Top Layer - Bottom Layer" at 19.466,100.254 h1.52
  text "Via" at 57.554,100.254 h1.52
  text "Rounded" at 72.537,100.254 h1.52
  text "v60h30" at 91.48,100.254 h1.52
  text "-" at 209.86,100.254 h1.52
  text "-" at 237.538,100.254 h1.52
  text "610 Total" at -57.729,96.444 h1.52
  text "Slot definitions :" at -70.578,92.761 h1.52
  text "Routed Path Length" at -44.348,92.761 h1.52
  text "= Calculated from tool start centre position to tool end centre position." at -16.34,92.761 h1.52
  text "Hole Length" at -44.348,90.222 h1.52
  text "= Routed Path Length + Tool Size = Slot length as defined in the PCB layout" at -26.751,90.222 h1.52